# Altium PCB Discharge_PCB.PcbDoc
Units mm, origin at the board's own origin, x right, y up, seen from the top; angles counter-clockwise.
Board outline 51.94 x 24.13 mm, 2 copper layers (Top Layer, Bottom Layer); 21 components, 12 nets, 40 pads, 34 vias.
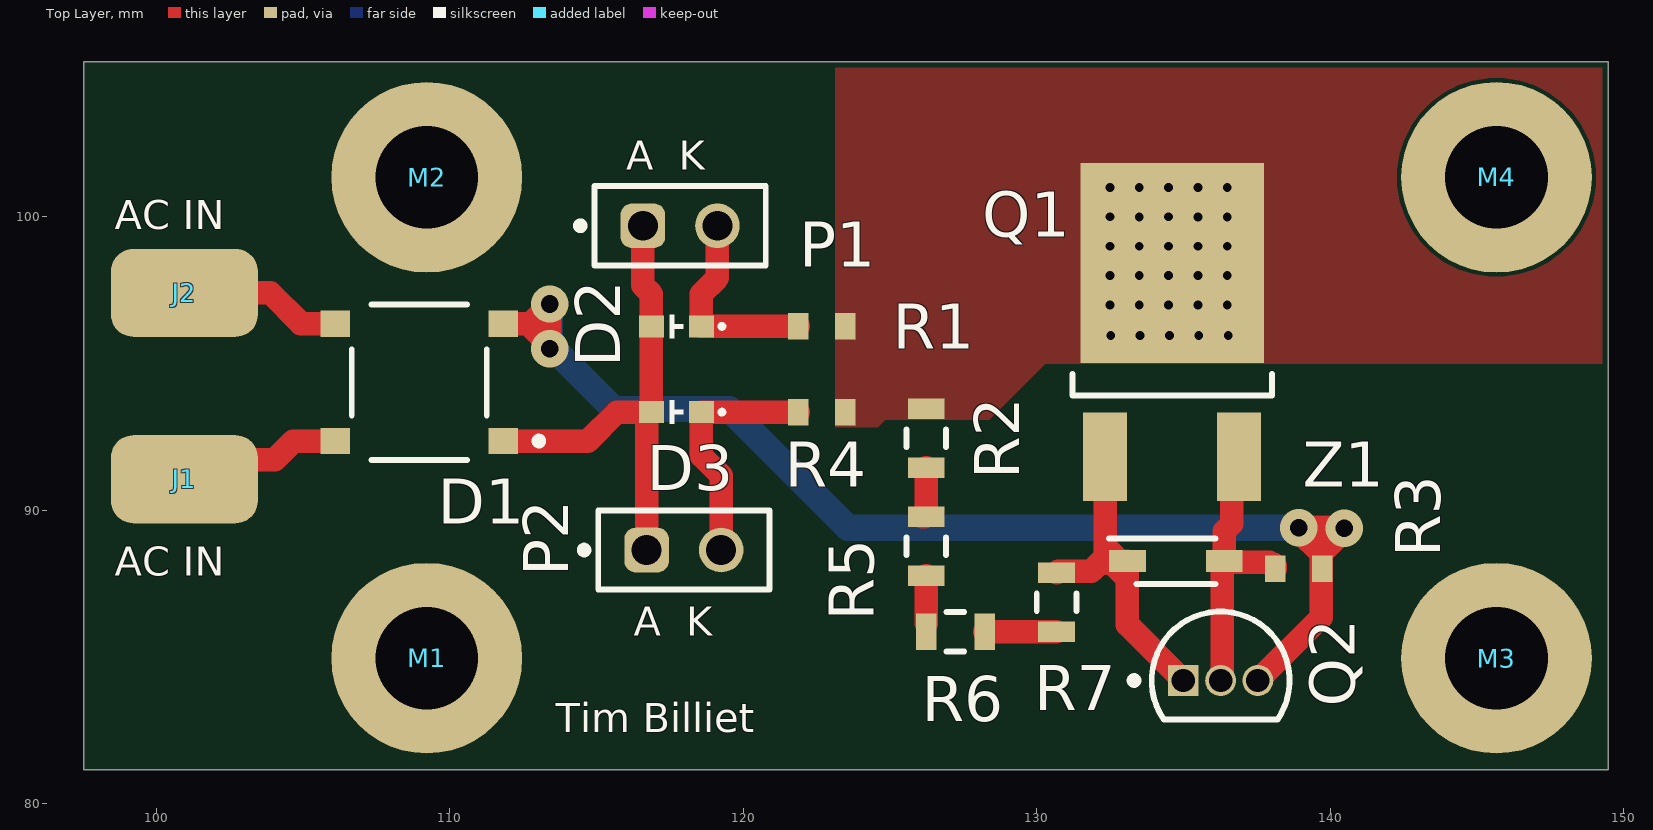
[diagram p0: Top Layer view]
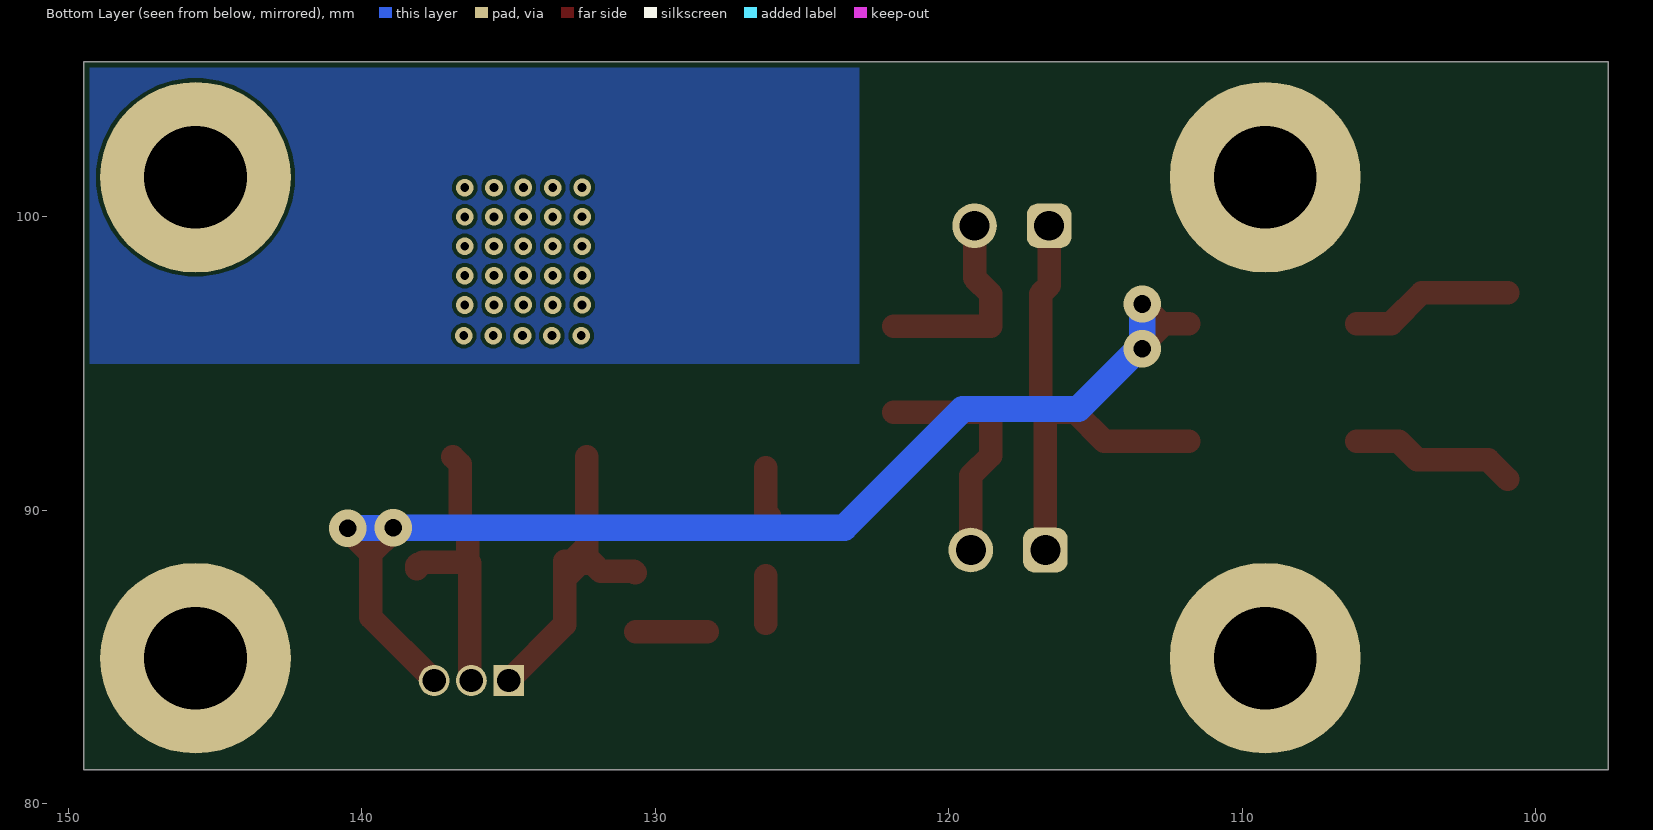
[diagram p1: Bottom Layer view, seen from below]
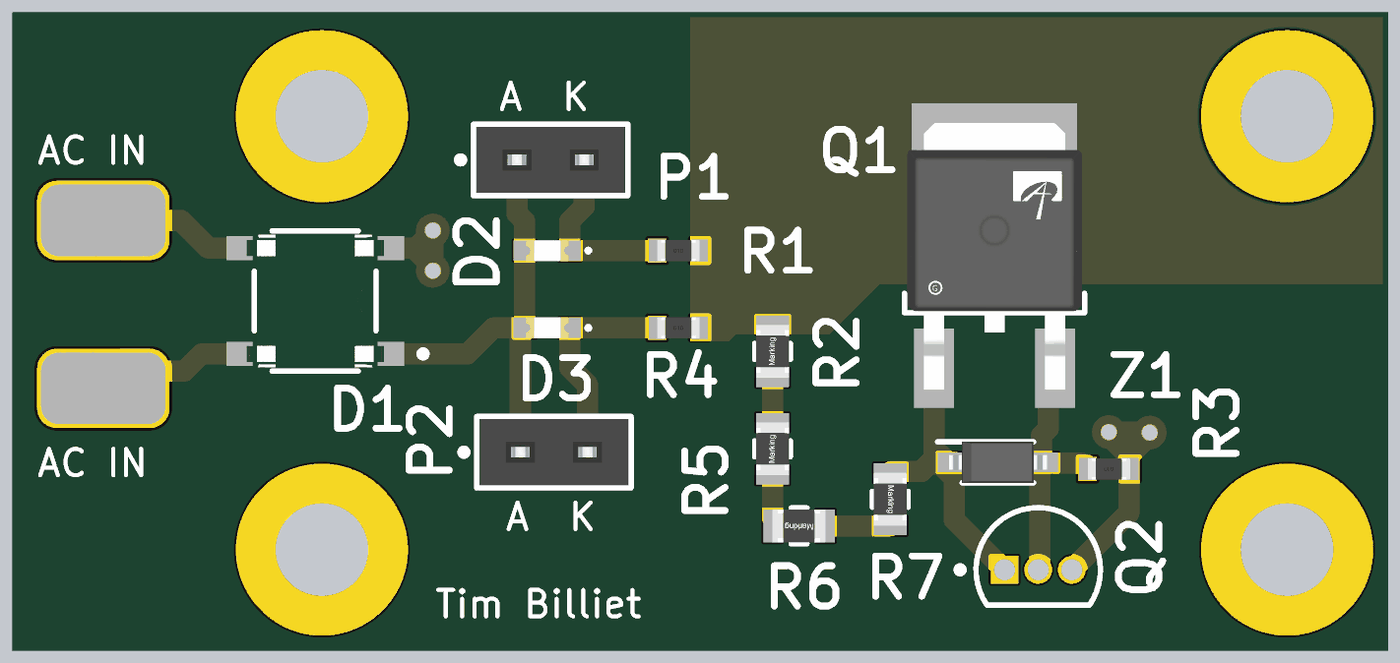
[diagram p2: 3D render of the assembled board from above, using the file's embedded part models]

## Layer stack, top to bottom
Top Solder: solder mask 0.0102, Solder Resist, Dk 3.5
Top Layer: signal copper 0.0356
Dielectric 1: dielectric 0.32, FR-4, Dk 4.8
Bottom Layer: signal copper 0.0356
Bottom Solder: solder mask 0.0102, Solder Resist, Dk 3.5

## Board outline
97.536,81.153 97.536,105.283 149.479,105.283 149.479,81.153

## Design rules (kind name [scope] priority, off if disabled: settings)
BoardOutlineClearance [All] p1: gap=0.2 ignorepadtopadclearanceinfootprint=FALSE
Clearance [All] p1: gap=0.127 ignorepadtopadclearanceinfootprint=FALSE except(0.2: Arc-Hole Track-Hole SMDPad-Hole THPad-Hole Via-Hole Fill-Hole Poly-Hole Region-Hole Text-Hole)
ComponentClearance [All] p1: gap=0.127 collisioncheckmode=3 verticalgap=0.127 showdistances=TRUE
DiffPairsRouting [All] p1: maxlimit=0.254 minlimit=0.127 mostfreqgap=0.127 toplayer_minwidth=0.127 toplayer_maxwidth=25.4 toplayer_prefwidth=0.127 bottomlayer_minwidth=0.127 bottomlayer_maxwidth=25.4 bottomlayer_prefwidth=0.127 maxuncoupledlength=12.7
Height [All] p1: minheight=0 maxheight=1816.048 prefheight=12.7
HoleSize [All] p1: absolutevalues=TRUE maxlimit=6.3 minlimit=0.15 maxpercent=80.000 minpercent=20.000
HoleToHoleClearance [All] p1: gap=0.25 allowstackedmicrovias=FALSE
MinimumAnnularRing [All] p1: minimumring=0.075
MinimumSolderMaskSliver [All] p1: minsoldermaskwidth=0
PlaneClearance [All] p1: clearance=0.127
PlaneConnect PlaneConnectPowerPads [InPadClass('PowerPads')] p1: planeconnectstyle=Direct reliefexpansion=0.508 reliefentries=4 reliefconductorwidth=0.254 reliefairgap=0.254
PlaneConnect [All] p2: pad.planeconnectstyle=Relief pad.reliefexpansion=0.3 pad.reliefentries=4 pad.reliefconductorwidth=0.127 pad.reliefairgap=0.127 via.planeconnectstyle=Direct via.reliefexpansion=0.3 via.reliefentries=4 via.reliefconductorwidth=0.127 via.reliefairgap=0.127
PolygonConnect PolygonConnectDirect [All vs InNet('NetQ1_4')] p1: connectstyle=Direct reliefconductorwidth=0.254 reliefentries=4 polygonreliefangle="90 Angle" airgapwidth=0.254
PolygonConnect PolygonConnectPowerPads [All vs (InPadClass('PowerPads'))] p2: connectstyle=Direct reliefconductorwidth=0.254 reliefentries=4 polygonreliefangle="90 Angle" airgapwidth=0.254
PolygonConnect [All] p3: thpad.connectstyle=Relief thpad.reliefconductorwidth=0.3 thpad.reliefentries=4 thpad.polygonreliefangle="90 Angle" thpad.airgapwidth=0.127 thpad.conductorbypadedge=TRUE thpad.mindistance=0.381 thpad.enablemindistance=FALSE smdpad.connectstyle=Relief smdpad.reliefconductorwidth=0.3 smdpad.reliefentries=4 smdpad.polygonreliefangle="90 Angle" smdpad.airgapwidth=0.127 smdpad.conductorbypadedge=TRUE smdpad.mindistance=0.381 smdpad.enablemindistance=FALSE via.connectstyle=Direct via.reliefconductorwidth=0.127 via.reliefentries=4 via.polygonreliefangle="90 Angle" via.airgapwidth=0.127
RoutingVias [All] p1: holewidth=0.3 width=0.6 viastyle="Through Hole" minholewidth=0.3 minwidth=0.6 maxholewidth=0.6 maxwidth=6.6
SilkToSilkClearance [All] p1: silktosilkclearance=0
SilkToSolderMaskClearance [IsPad] p1: minsilkscreentomaskgap=0.127 clearancetoexposedcopper=TRUE
SolderMaskExpansion SolderMaskExpansionVia [isVia] p1: expansion=0.102 istentingtop=TRUE
SolderMaskExpansion [All] p2: expansion=0.075 istentingtop=FALSE useseparateexpansions=TRUE expansionbottom=0.075 istentingbottom=FALSE
SupplyNets "Schematic Supply Nets_4" [InNet('GND')] p1: voltage=0.000
Width [All] p1: maxlimit=25.4 minlimit=0.127 preferedwidth=0.127 minimp=50.000000 maximp=50.000000 favimp=50.000000
20 further rules are at their usual default settings.

## Components (designator, comment, footprint, x,y, rotation, side; value= is the part's Value field where it differs from the comment)
D1 "ABS10A-13" "Yangjie ABS10" 108.966,94.361 r180 top
D2 "Red, 2V, 140°" "Wurth 0603 LED" 117.729,96.266 r180 top
D3 "Red, 2V, 140°" "Wurth 0603 LED" 117.729,93.345 r180 top
J1 "Solder pad" "Solder Pad 3X5MM"#1 100.711,91.059 r90 top
J2 "Solder pad" "Solder Pad 3X5MM"#2 100.965,97.409 r90 top
M1 "Mounting hole" "M3 hole"#1 109.347,84.455 r0 top
M2 "Mounting hole" "M3 hole"#2 109.22,102.235 r0 top
M3 "Mounting hole" "M3 hole"#3 145.669,84.963 r0 top
M4 "Mounting hole" "M3 hole"#4 145.288,101.346 r0 top
P1 "61300211121" "2x1 2.54mm F" 117.856,99.695 r0 top
P2 "61300211121" "2x1 2.54mm F" 117.983,88.646 r0 top
Q1 "AOD4184A" FP-TO252-MFG 134.62,97.028 r0 top
Q2 "BC547B" ONSC-TO-92-3-29-11 136.271,84.201 r0 top
R1 "Resistor 100R 0603" "Wurth 0603 Resistor bigger" 122.682,96.266 r0 top value=100R
R2 "Resistor 39k 0805" "wurth 0805 Resistor" 126.238,92.456 r90 top value=39k
R3 "Resistor 27R 0603" "Wurth 0603 Resistor bigger" 138.938,88.011 r180 top value=27R
R4 "Resistor 100R 0603" "Wurth 0603 Resistor bigger" 122.682,93.345 r0 top value=100R
R5 "Resistor 39k 0805" "wurth 0805 Resistor" 126.238,88.773 r90 top value=39k
R6 "Resistor 39k 0805" "wurth 0805 Resistor" 127.238,85.863 r180 top value=39k
R7 "Resistor 39k 0805" "wurth 0805 Resistor" 130.683,86.868 r270 top value=39k
Z1 "BZT52B15" "Yongyutai SOD-123" 134.747,88.265 r0 top

## Footprints (in the part's own frame and the unit in brackets; to place one, negate y for a bottom-side part, rotate by r counter-clockwise, add the part's x,y. Pads: shape width x height; smd on the part's side, far side on the other; paste and mask are expansions set on the pad)
"2x1 2.54mm F" [mm] "Socket Header, Pitch 2.54 mm, THT, Vertical, single row, 2p"
  rrect50% 1.52x1.52 hole 1.02: 1(-1.27,0)
  round 1.52 hole 1.02: 2(1.27,0)
  silkscreen extent -3.52,-1.35 2.92,1.35, body extent -2.79,-1.25 2.79,1.25, height 8.55
FP-TO252-MFG [mm]
  rect 1.5x3 smd paste+0 mask+0: 1(-2.286,-5.202) 3(2.286,-5.202)
  rect 6.25x6.8 smd paste+0 mask+0: 4(0,1.398)
  silkscreen extent -3.4,-3.11 3.4,-2.38, body extent -3.58,-6.8 3.58,4.9, height 0.25
"M3 hole"#1 [mm]
  round 6.5 hole 3.5: 1(-0.127,0.508)
"M3 hole"#2 [mm]
  round 6.5 hole 3.5: 1(0,-0.889)
"M3 hole"#3 [mm]
  round 6.5 hole 3.5: 1(0,0)
"M3 hole"#4 [mm]
  round 6.5 hole 3.5: 1(0.381,0)
ONSC-TO-92-3-29-11 [mm] "TO, 3-Leads, Body Dia 4.7mm, Pitch 1.27mm"
  rect 1.05x1.05 hole 0.8: 1(-1.27,0)
  round 1.05 hole 0.8: 2(0,0) 3(1.27,0)
  silkscreen extent -3.07,-1.34 2.35,2.35, body extent -2.35,-1.33 2.36,2.36, height 7.87
"Solder Pad 3X5MM"#1 [mm]
  rrect50% 3x5 smd paste-0.147 mask+0.1: 1(0,-0.254)
"Solder Pad 3X5MM"#2 [mm]
  rrect50% 3x5 smd paste-0.147 mask+0.1: 1(0,0)
"Wurth 0603 LED" [mm] "SMD Mono-color Chip LED, body 1.6x0.8mm"
  rect 0.85x0.75 smd: 1(-0.85,0) 2(0.85,0)
  silkscreen extent -1.63,-0.4 0.22,0.4, body extent -0.8,-0.4 0.8,0.4, height 0.42
"Wurth 0603 Resistor bigger" [mm] "Fixed Thick Film, body 1.60 x 0.80 mm"
  rect 0.7x0.9 smd paste-0.031 mask+0.1: 1(-0.8,0) 2(0.8,0)
  body extent -0.8,-0.4 0.8,0.4, height 0.45
"wurth 0805 Resistor" [mm] "Thick Film Resistors, SMT, body size 2x1.25mm"
  rect 0.7x1.25 smd: 1(-1,0) 2(1,0)
  silkscreen extent -0.3,-0.67 0.3,0.67, body extent -1,-0.62 1,0.63, height 0.6
"Yangjie ABS10" [mm]
  rect 1x0.9 smd paste+0 mask+0: 1(-2.86,2) 2(2.86,2) 3(-2.86,-2) 4(2.86,-2)
  silkscreen extent -4.2,-2.65 2.3,2.65, body extent -3.55,-2.75 3.55,2.75, height 0.25
"Yongyutai SOD-123" [mm]
  rect 1.25x0.75 smd: 1(-1.65,0) 2(1.65,0)
  silkscreen extent -2.27,-0.77 1.35,0.77, body extent -1.85,-0.77 1.85,0.77, height 1.35

## Part data
D1: library part "Yangjie ABS10 bruggelijkrichter", "BRIDGE RECT 1PHASE 1KV 1A"
D2 D3: library part "LED RED 0603", "WL-SMCD Mono-color Chip LED Diffused, SMT, size 0603, Red, 2V, 140°", Case/Size Code=0603, Emitting Color=Red, Forward Voltage=2V, Manufacturer="Wurth Elektronik", Manufacturer Part Number=150060RS55040, Operating Temperature Max=85°C, Operating Temperature Min=-40°C, Category="Signal LEDs", Chip Technology=AlInGaP, ComponentLink1Description="Website Link", ComponentLink1URL=https://www.we-online.com/redexpert/article/150060RS55040?ad, ComponentLink2Description="Datasheet Link", ComponentLink2URL=https://www.we-online.com/redexpert/spec/150060RS55040?ad, Dominant Wavelength=624nm, Height=0.4mm, Length=1.6mm, Luminous Intensity=90mcd, Match Code=WL-SMCD, Mount="Surface Mount", Packaging="Tape and Reel", Peak Wavelength=632nm, Viewing Angle=140°, Width=0.8mm
P1 P2: library part 2P, "WR-PHD Pin Header, THT, Vertical, pitch 2.54mm, 1 Row, 2P", Contact Resistance=20mOhm, Manufacturer="Wurth Elektronik", Operating Temperature Max=105°C, Operating Temperature Min=-40°C, Rated Current=3A, Withstanding Voltage=500V, Working Voltage=250V, Category="Board-to-Board Connectors", ComponentLink1Description="Website Link", ComponentLink1URL=https://www.we-online.com/redexpert/article/61300211121?ad, ComponentLink2Description="Datasheet Link", ComponentLink2URL=https://www.we-online.com/redexpert/spec/61300211121?ad, Gender="Pin Header", Manufacturer Part Number=61300211121, Match Code=WR-PHD, Mount="Through Hole", Number of Pins=2, Number of Rows=1, Orientation=Vertical, Packaging=Bag, Pitch=2.54mm
Q1: library part CMP-83955-000007-1, "MOSFET N-CH 40V 50A TO252", Case/Package=DPAK, Continuous Drain Current (ID)=50A, Drain to Source Voltage (Vdss)=40V, Gate to Source Voltage (Vgs)=20V, Input Capacitance=1.8nF, Max Operating Temperature=175°C, Max Power Dissipation=2.3W, Min Operating Temperature=-55°C, Power Dissipation=50W, Mount="Surface Mount", Number of Elements=1, Number of Pins=3, Packaging="Cut Tape", Radiation Hardening=No, Rds On Max=7mR
Q2: library part CMP-1048-01467-1, "Amplifier Transistor, NPN Silicon, 3-Pin TO-92, Bulk Box", Manufacturer="On Semiconductor", ComponentLink1Description="Manufacturer URL", ComponentLink1URL=http://www.onsemi.com/, ComponentLink2Description=Datasheet, ComponentLink2URL=http://www.onsemi.com/pub_link/Collateral/BC546-D.PDF, ComponentLink3Description="Package Specification", ComponentLink3URL=http://www.onsemi.cn/pub_link/Collateral/2N6426-D.PDF, DatasheetVersion="Rev. 7", fT Min (MHz)=150, IC Continuous (A)=0.1, Mounting Technology="Through Hole", PackageDescription="3-Pin Transistor Outline, Body 4.825 x 3.685 mm, Pitch 1.27 mm", PackageReference=TO-92-3-29-11_AM_SL, PackageVersion="Rev. AM", Packing="Bulk Box", PartNumber=BC547B, Polarity=NPN, RoHS=FALSE
R2 R5 R6 R7: library part "Resistor 39k 0805 250mW", "250mW"
Z1: "Zener Diode", Arrow Part Number=BZT52B15-E3-18, Manufacturer_Name=Vishay, Mouser Part Number=78-BZT52B15-E3-18, Arrow Price/Stock=https://www.arrow.com/en/products/bzt52b15-e3-18/vishay?region=nac, Datasheet Link=https://www.vishay.com/docs/85760/bzt52.pdf, Height=1.35mm, Manufacturer_Part_Number=BZT52B15-E3-18, Mouser Price/Stock=https://www.mouser.co.uk/ProductDetail/Vishay-Semiconductors/BZT52B15-E3-18?qs=KP8Io%2FXyE5SvlbRZ336LSg%3D%3D

## Via types
v1: diameter 0.6, hole 0.3, Top Layer to Bottom Layer, tented both sides, 30 vias
v2: diameter 1.27, hole 0.6, Top Layer to Bottom Layer, tented both sides, 4 vias

## Nets (pads, with @x,y where several pads share a name; then routed paths per layer and width w, separated by ;. In a path a pad name is that pad's centre, name@x,y a point inside that pad or via, vN(x,y) a via of type N, cw(c..) or ccw(c..) an arc to the next point about the centre after c; other vN are vias at no path point)
GND: D1.3 Q2.3 R3.1 | length 46.2
  Top Layer w0.8: D1.3 112.776,96.361 ; v2(113.411,95.504) v2@113.411,95.631 ; v2(113.411,97.028) v2@113.411,96.996 ; Q2.3 139.7,86.36 139.7,88.519 ; 112.776,96.361 112.776,96.266 v2@113.411,95.631 ; 112.776,96.361 113.316,96.361 113.411,96.266 ; 112.776,96.361 v2@113.411,96.996 ; v2@113.411,95.631 113.411,96.266 ; 113.411,96.266 v2@113.411,96.996 ; 139.7,88.519 139.7,89.388 139.71,89.398 ; 139.7,88.519 140.482,89.301 v2(140.482,89.388) 140.472,89.398 139.71,89.398 ; 139.7,88.519 138.938,89.281 v2(138.938,89.408) 138.948,89.398 139.71,89.398
  Bottom Layer w0.9: v2(113.411,97.028) v2(113.411,95.504) 113.538,95.504 115.591,93.451 119.528,93.451 123.571,89.408 v2(138.938,89.408) 138.948,89.398 140.472,89.398 v2(140.482,89.388)
NetD1_1: D1.1 D2.2 D3.2 P1.1 P2.1 | length 16.7
  Top Layer w0.8: D1.1 114.713,92.361 115.697,93.345 D3.2@116.829,93.345 ; P1.1 116.586,97.663 116.879,97.37 D2.2 D3.2 D3.2@116.829,93.345 ; P2.1 116.713,93.229 D3.2@116.829,93.345
NetD1_2: D1.2 J1.1 | length 5.7
  Top Layer w0.8: J1.1 101.624,91.718 104.037,91.718 104.68,92.361 D1.2
NetD1_4: D1.4 J2.1 | length 5.6
  Top Layer w0.8: J2.1 103.886,97.409 104.934,96.361 D1.4
NetD2_1: D2.1 P1.2 R1.1 | length 7
  Top Layer w0.8: P1.2 119.126,97.917 118.579,97.37 D2.1 R1.1
NetD3_1: D3.1 P2.2 R4.1 | length 8.3
  Top Layer w0.8: P2.2 119.253,91.186 118.579,91.86 D3.1 R4.1
NetQ1_1: Q1.1 Q2.1 R7.1 Z1.1 | length 12.9
  Top Layer w0.8: R7.1 130.733,87.918 131.86,87.918 132.132,88.19 ; Q1.1 132.334,88.773 ; Q2.1 133.097,86.105 133.097,87.503 133.097,87.67 ; 132.132,88.19 Z1.1@132.577,88.19 ; 132.132,88.19 132.334,88.392 132.334,88.773 ; 132.334,88.773 132.339,88.773 132.847,88.265 Z1.1 Z1.1@133.022,88.19 ; Z1.1@132.577,88.19 Z1.1@133.022,88.19 ; Z1.1@132.577,88.19 133.097,87.67 ; Z1.1@133.022,88.19 133.097,88.19 133.097,87.67
NetQ1_3: Q1.3 Q2.2 R3.2 Z1.2 | length 9.8
  Top Layer w0.8: Q2.2 136.334,84.264 136.334,88.202 136.359,88.227 137.922,88.227 137.988,88.161 138.088,88.161 138.138,88.111 R3.2 ; Z1.2 136.397,89.28 136.652,89.535 136.652,91.572 Q1.3
NetQ1_4: Q1.4 R1.2 R2.2 R4.2
  other v1: 132.529,95.954 133.529,95.951 134.529,95.954 135.529,95.951 136.529,95.951 132.5,97 133.5,96.997 134.5,97 135.5,96.997 136.5,96.997 132.5,98 133.5,97.997 134.5,98 135.5,97.997 136.5,97.997 132.5,99 133.5,98.997 134.5,99 135.5,98.997 136.5,98.997 132.5,100 133.5,99.997 134.5,100 135.5,99.997 136.5,99.997 132.5,101 133.5,100.997 134.5,101 135.5,100.997 136.5,100.997
NetR2_1: R2.1 R5.2 | length 1.8
  Top Layer w0.8: R5.2@126.111,89.773 126.188,89.773 126.238,89.823 R2.1
NetR5_1: R5.1 R6.2 | length 1.6
  Top Layer w0.8: R6.2@126.238,86.143 R5.1
NetR6_1: R6.1 R7.2 | length 2.4
  Top Layer w0.6: R7.2@130.678,85.863 R7.2
  Top Layer w0.8: R6.1 R7.2@130.678,85.863
pads on no net: M1.1 M2.1 M3.1 M4.1

## Polygon pours and split planes (outlines as drawn)
NetQ1_4 on Top Layer "NONET_L-01_P-001" (solid, pour order 0): 123.134,92.837 124.587,92.837 124.841,93.091 128.397,93.091 130.302,94.996 149.479,94.996 149.479,105.283 123.134,105.283
no net on Bottom Layer "NONET_L-01_P-001" (solid, pour order 1): 149.479,94.996 149.479,105.283 123.063,105.283 123.063,94.996

## Silkscreen, mask and mechanical layers (free items; w line width, h text height)
Top Overlay:
  text "A  K" at 116.023,101.608 h1
  text "AC IN" at 98.589,99.576 h1
  text "AC IN" at 98.589,87.765 h1
  text "A  K" at 116.277,85.733 h1
  text "Tim Billiet" at 113.616,82.431 h1
Mechanical 1:
  the board outline again, w0.1